# EAGLE board revision-g-branches (EAGLE ?)
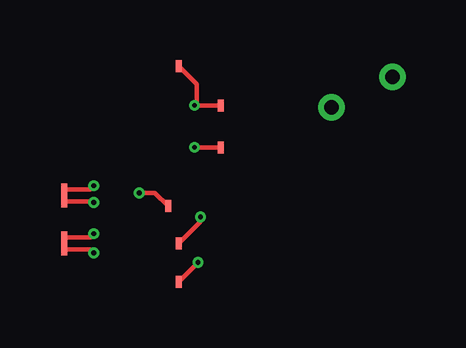
[diagram p0: board, top side]
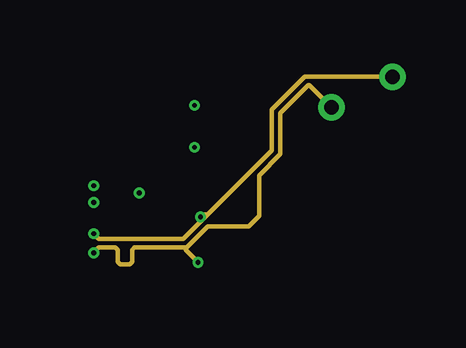
[diagram p1: board, inner layer 15]
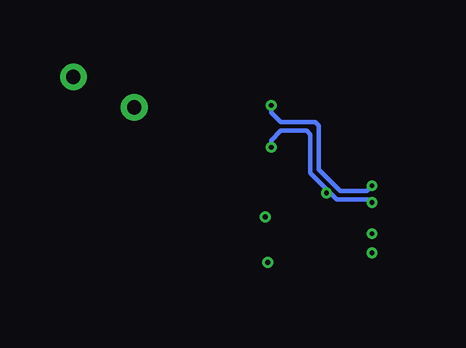
[diagram p2: board, bottom side, seen from below]

No outline drawn. Coordinates in mm, seen from the top.
Copper layers (1*2*15*16): layer 1 / layer 2 / layer 15 / layer 16
Design rules: minimum drill 0.20mm, track to track 0.13mm, minimum via ring 0.075mm

## Footprints (pad centres in the part's own frame; a part is rotated, then mirrored left to right if it is on the bottom)
C45 = smd 0.25 x 0.5: 1 116.7,73.15
C46 = smd 0.25 x 0.5: 1 116.7,71.4
J7 = drill 0.6 pad 1: 1 123.85,74.345; 2 121.31,73.075
R49 = smd 0.25 x 0.5: 1 114.95,67.4
R50 = smd 0.25 x 0.5: 1 114.95,65.8
R52 = smd 0.25 x 0.5: 1 114.95,74.8
R53 = smd 0.25 x 0.5: 1 114.5,68.95
U10 = smd 0.25 x 0.5: 1 110.178,67.15; 2 110.178,67.65; 5 110.178,69.15; 6 110.178,69.65

## Placement (x,y rotation side)
C45  [C45]  0,0 0 top
C46  [C46]  0,0 0 top
J7  [J7]  0,0 0 top
R49  [R49]  0,0 0 top
R50  [R50]  0,0 0 top
R52  [R52]  0,0 0 top
R53  [R53]  0,0 0 top
U10  [U10]  0,0 0 top

## Library data of the parts
C45 C46 J7 R49 R50 R52 R53 U10 = REGRESSION

## Nets
ETH_RX_N: C46.1 R53.1 U10.5
ETH_RX_P: C45.1 R52.1 U10.6
ETH_TX_N: J7.2 R50.1 U10.1
ETH_TX_P: J7.1 R49.1 U10.2

## Tracks (layer width: path | path; a pad name or v marks a point on that pad's centre or on a via)
ETH_RX_N  (via drill 0.2 pad 0.45)
  layer 1 0.18: U10.5 111.35,69.15 v111.4,69.1 | v115.6,71.4 C46.1 | v113.3,69.5 113.6,69.5 113.95,69.5 R53.1
  layer 16 0.18: v111.4,69.1 111.52,69.22 112.2,69.22 112.88,69.22 113.98,70.33 113.98,71.94 114.13,72.09 115.2,72.09 115.6,71.69 v115.6,71.4 | v113.3,69.5 113.16,69.5
ETH_RX_P  (via drill 0.2 pad 0.45)
  layer 1 0.18: U10.6 111.25,69.65 v111.4,69.8 | v115.6,73.15 C45.1 | R52.1 115.7,74.05 115.7,73.15
  layer 16 0.18: v111.4,69.8 111.62,69.58 112.2,69.58 112.72,69.58 113.62,70.47 113.62,72.31 113.77,72.45 115.2,72.45 115.6,72.86 v115.6,73.15
ETH_TX_N  (via drill 0.2 pad 0.45)
  layer 1 0.18: U10.1 111.25,67.15 v111.4,67 | R50.1 v115.75,66.6
  layer 15 0.18: v111.4,67 111.62,67.22 112.2,67.22 112.3,67.22 112.4,67.12 112.4,66.62 112.5,66.52 112.9,66.52 113,66.62 113,67.12 113.1,67.22 113.2,67.22 115.28,67.22 116.16,68.11 117.86,68.11 118.29,68.54 118.29,70.24 119.18,71.12 119.18,72.83 120.33,73.97 120.35,74 120.39,74 J7.2 | v115.75,66.6 115.23,67.12 115.23,67.22
ETH_TX_P  (via drill 0.2 pad 0.45)
  layer 1 0.18: U10.2 111.25,67.65 v111.4,67.8 | R49.1 115.85,68.3 v115.85,68.5
  layer 15 0.18: v111.4,67.8 111.62,67.58 112.2,67.58 115.12,67.58 118.82,71.28 118.82,72.97 120.07,74.23 120.19,74.34 J7.1 | v115.85,68.5 115.95,68.6 116.14,68.6